# Altium PCB Grabber.PCBDOC (part 2 of 5)
Units mm, origin at the board's own origin, x right, y up, seen from the top; angles counter-clockwise.
Board outline 72.5 x 100 mm, 4 copper layers (TopLayer, Internal Plane 2, Layer 1, Bottom Layer), stack 1.543 mm thick; 160 components, 116 nets, 692 pads, 242 vias.
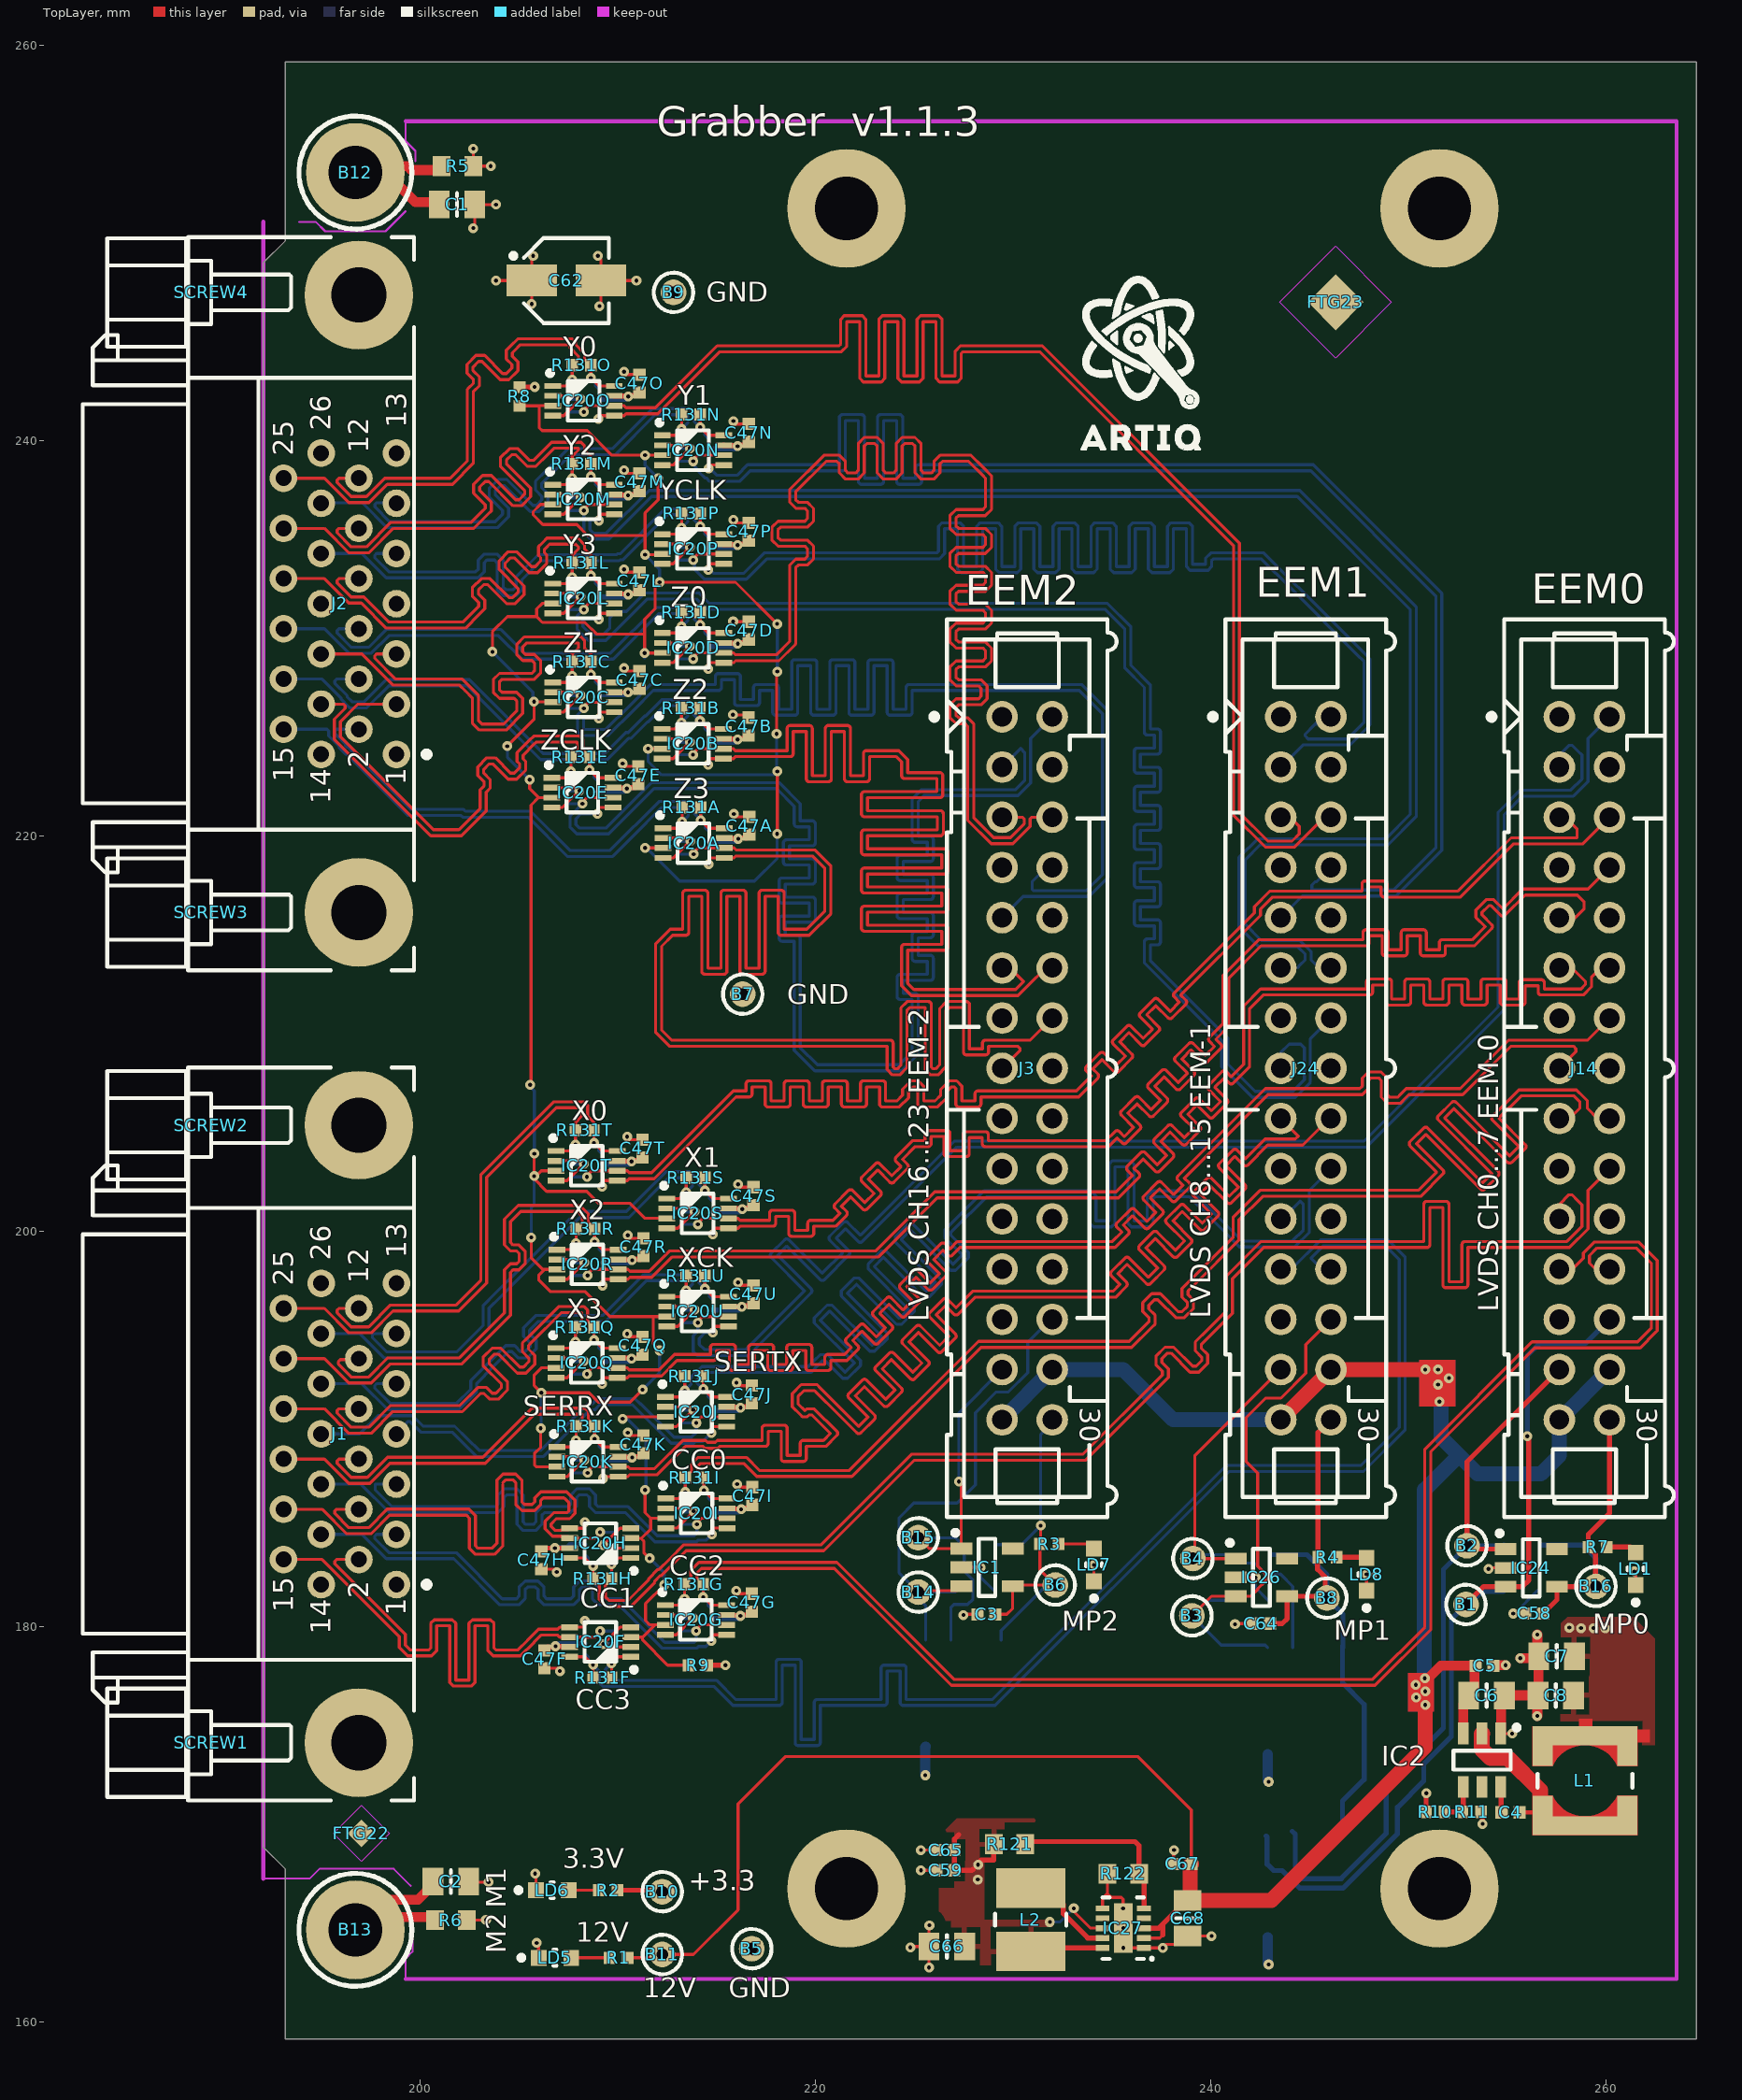
[diagram p0: TopLayer view]

## Via types
v1: diameter 0.5, hole 0.2, TopLayer to Bottom Layer, tented both sides, 242 vias

## Nets (pads, with @x,y where several pads share a name; then routed paths per layer and width w, separated by ;. In a path a pad name is that pad's centre, name@x,y a point inside that pad or via, vN(x,y) a via of type N, cw(c..) or ccw(c..) an arc to the next point about the centre after c; other vN are vias at no path point)
CC0_N: D1I.6 IC20I.5 J1.18 | length 26.9
  TopLayer w0.152: v1(214.785,184.675) 214.785,184.889 214.888,184.991 IC20I.5@215.562,184.991
  Bottom Layer w0.152: J1.18@195.016,187.216 197.036,187.216 198.476,185.776 203.964,185.776 204.273,186.085 204.273,186.545 204.403,186.676 204.795,186.676 204.925,186.545 204.925,185.185 205.234,184.876 205.878,184.876 206.187,185.185 206.187,185.645 206.317,185.776 207.339,185.776 207.631,185.776 207.94,186.085 207.94,186.545 208.07,186.676 208.461,186.676 208.592,186.545 208.592,186.085 208.901,185.776 210.27,185.776 210.416,185.776 211.806,184.386 211.895,184.297 214.007,184.297 214.097,184.386 214.496,184.386 v1(214.785,184.675) 214.802,184.692 D1I.6@214.802,185.316
CC0_P: D1I.1 IC20I.6 J1.5 | length 25.8
  TopLayer w0.152: v1(214.023,185.183) 214.023,185.252 214.262,185.491 IC20I.6@215.562,185.491
  Bottom Layer w0.152: J1.5@198.826,187.216 197.748,187.216 197.748,186.935 198.603,186.08 203.837,186.08 203.968,186.211 203.968,186.671 204.277,186.98 204.921,186.98 205.23,186.671 205.23,185.311 205.36,185.18 205.752,185.18 205.882,185.311 205.882,185.771 206.191,186.08 207.339,186.08 207.504,186.08 207.635,186.211 207.635,186.671 207.944,186.98 208.588,186.98 208.897,186.671 208.897,186.211 209.027,186.08 210.27,186.08 210.542,186.08 212.021,184.601 213.881,184.601 214.023,184.744 v1(214.023,185.183) 213.355,185.183 D1I.1@213.222,185.316
CC1_N: D1H.6 IC20H.5 J1.4 | length 26.2
  TopLayer w0.152: J1.4@196.921,185.946 195.795,185.946 195.706,185.857 195.706,185.731 196.419,185.018 197.423,185.018 198.354,185.949 202.49,185.949 202.821,185.618 202.821,184.101 202.947,183.975 203.658,183.975 203.906,184.223 203.906,186.961 203.906,187.191 203.906,187.422 204.215,187.731 204.859,187.731 205.168,187.422 205.168,186.32 205.299,186.19 205.69,186.19 205.821,186.32 205.821,186.522 206.13,186.831 206.421,186.831 207.429,186.831 207.858,186.402 207.858,185.739 207.59,185.471 206.915,185.471 206.648,185.204 206.648,185.077 206.843,184.883 207.147,184.883 207.171,184.907 207.512,184.907 IC20H.5@207.585,184.98 208.26,184.98 208.362,185.083 v1(208.362,185.296)
  Bottom Layer w0.152: D1H.6@208.345,184.655 208.345,185.279 v1(208.362,185.296)
CC1_P: D1H.1 IC20H.6 J1.17 | length 28.4
  TopLayer w0.152: J1.17@193.111,185.946 195.059,185.946 196.293,184.713 197.549,184.713 198.48,185.644 202.364,185.644 202.516,185.491 202.516,183.975 202.821,183.67 203.784,183.67 204.211,184.097 204.211,187.191 ; 204.211,187.295 204.342,187.426 204.733,187.426 204.863,187.295 204.863,186.194 205.173,185.885 205.816,185.885 206.125,186.194 206.125,186.395 206.256,186.526 206.421,186.526 207.303,186.526 207.337,186.491 207.553,186.276 207.553,185.865 207.464,185.776 206.789,185.776 206.343,185.33 206.343,184.951 206.716,184.578 207.147,184.578 207.171,184.554 207.512,184.554 IC20H.6@207.585,184.48 208.885,184.48 209.124,184.719 v1(209.124,184.788)
  Bottom Layer w0.152: v1(209.124,184.788) 209.792,184.788 D1H.1@209.925,184.655
CC2_N: D1G.6 IC20G.5 J1.16 | length 26.5
  TopLayer w0.152: v1(214.75,179.282) 214.75,179.496 214.853,179.598 IC20G.5@215.527,179.598
  Bottom Layer w0.152: J1.16@195.016,184.676 197.082,184.676 198.315,183.443 201.723,183.443 202.059,183.106 204.052,181.113 205.025,181.113 205.334,181.422 205.334,181.883 205.464,182.013 205.856,182.013 205.986,181.883 205.986,181.422 206.295,181.113 207.487,181.113 207.779,181.113 208.088,181.422 208.088,181.883 208.219,182.013 208.61,182.013 208.741,181.883 208.741,181.422 209.05,181.113 209.925,181.113 210.078,181.113 212.186,179.006 212.275,178.917 214.019,178.917 214.108,179.006 214.474,179.006 v1(214.75,179.282) 214.767,179.299 D1G.6@214.767,179.923